# Altium PCB S56_MLD_tiny.pcbdoc (part 2 of 3)
Units mm, origin at the board's own origin, x right, y up, seen from the top; angles counter-clockwise.
Board outline 37.7 x 36.5 mm, 4 copper layers (Top Layer, Layer 1, Layer 3, Bottom Layer), stack 1.748 mm thick; 192 components, 89 nets, 791 pads, 423 vias.
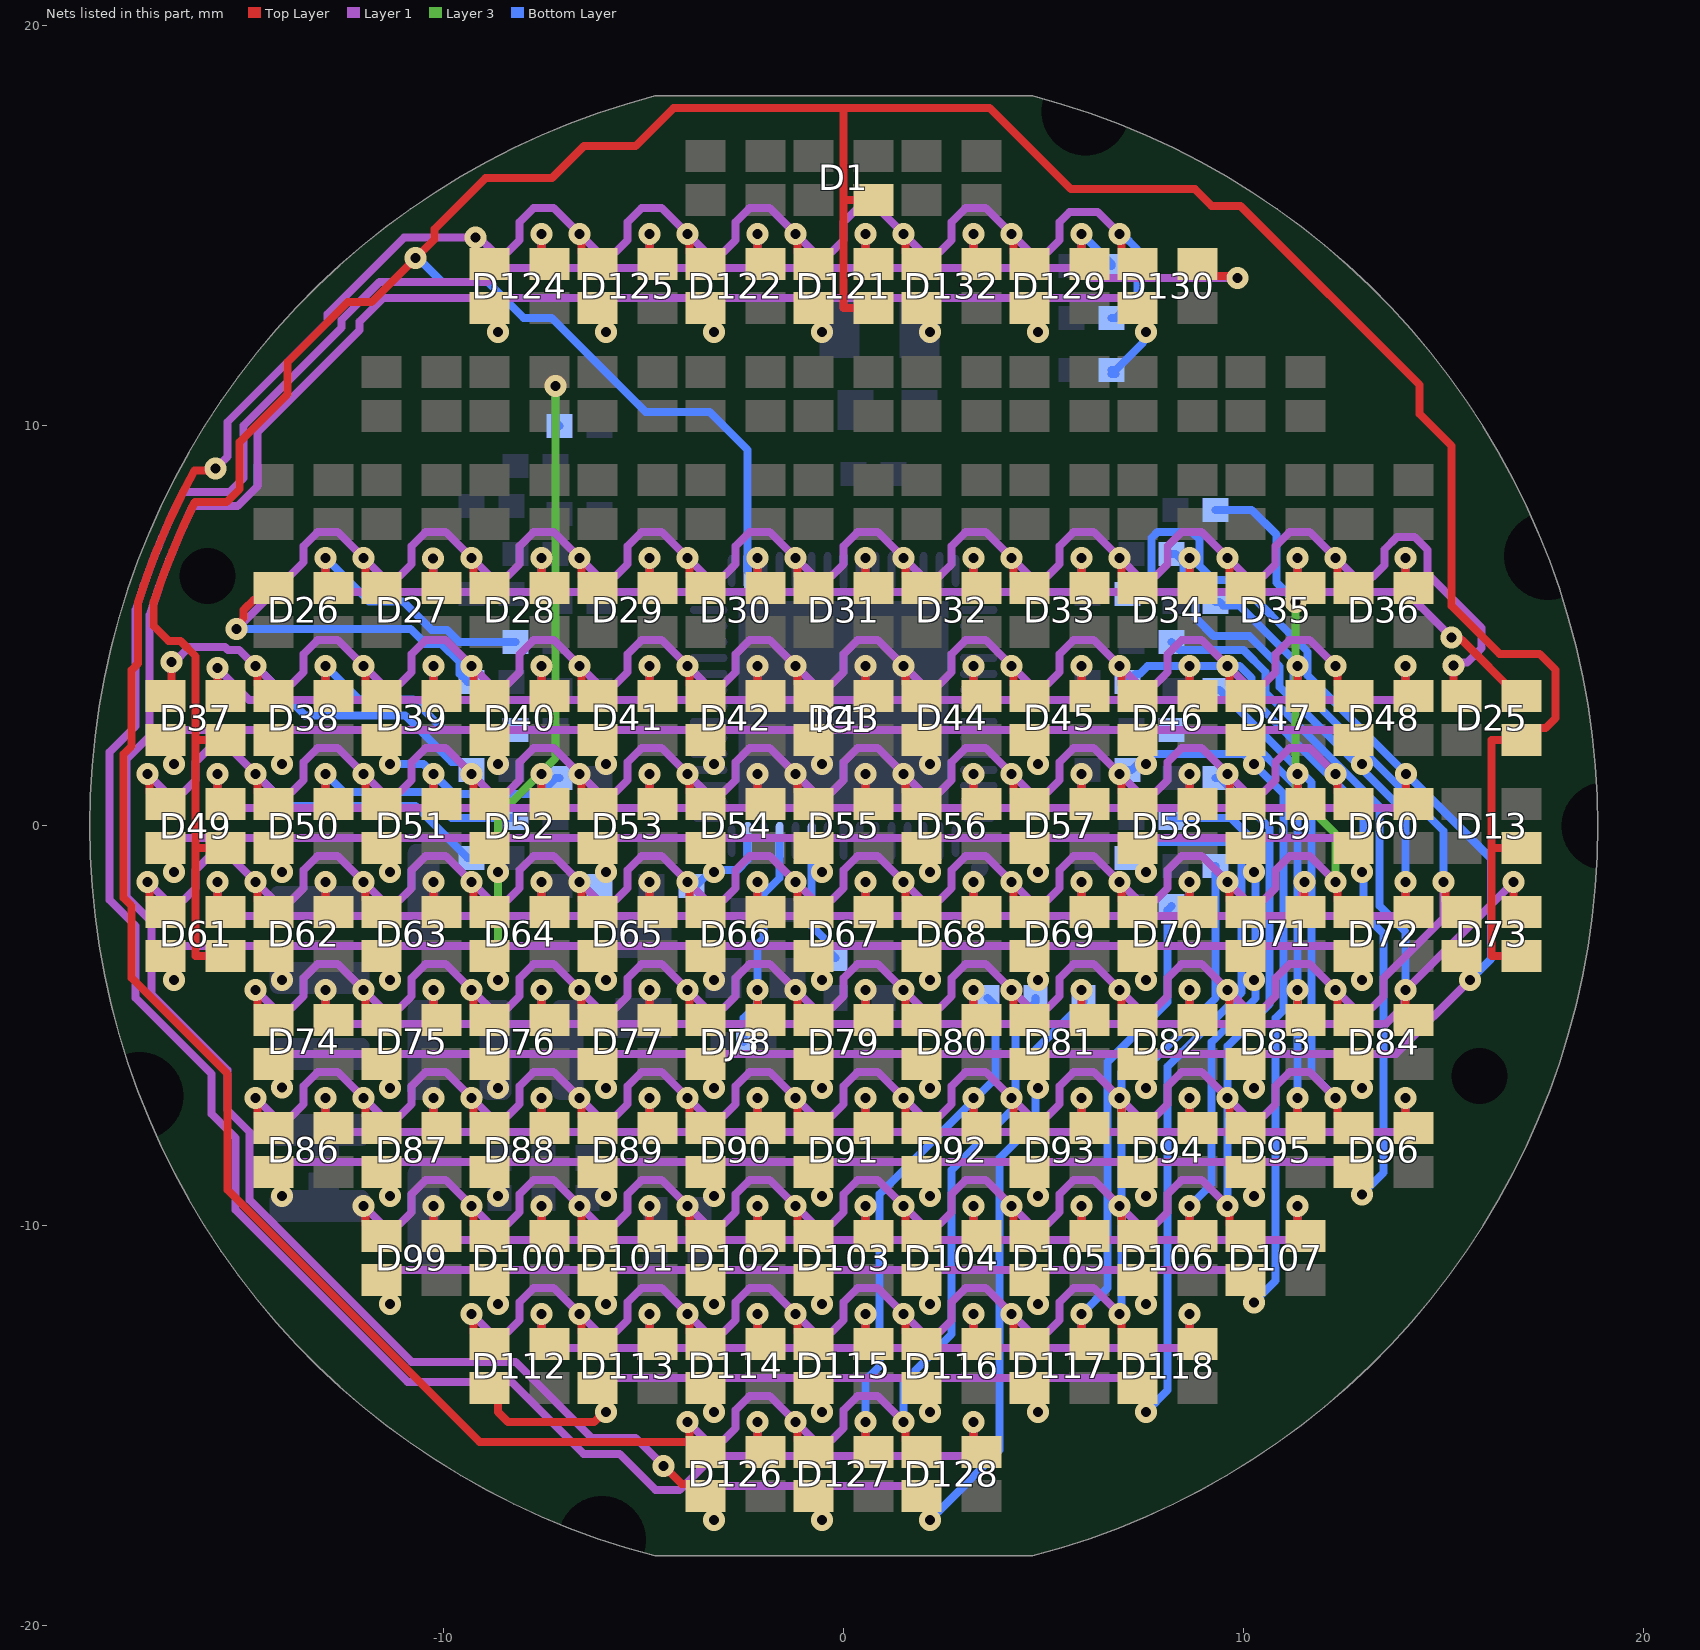
[diagram p4: the nets of this part, all layers, seen from the top]

## Via types
v1: diameter 0.55, hole 0.25, Top Layer to Layer 1, tented both sides, 200 vias
v2: diameter 0.55, hole 0.25, Top Layer to Bottom Layer, tented both sides, 178 vias
v3: diameter 0.55, hole 0.25, Layer 3 to Bottom Layer, tented both sides, 44 vias
v4: diameter 0.55/0.55/0.55/0.55 (per signal layer), hole 0.25, Top Layer to Bottom Layer, tented both sides, 1 vias

## Nets (pads, with @x,y where several pads share a name; then routed paths per layer and width w, separated by ;. In a path a pad name is that pad's centre, name@x,y a point inside that pad or via, vN(x,y) a via of type N, cw(c..) or ccw(c..) an arc to the next point about the centre after c; other vN are vias at no path point) (continued)
NetD25_3: D25.3 D26.3 D27.3 D28.3 D29.3 D30.3 D31.3 D32.3 D33.3 D34.3 D35.3 D36.3 R13.1 | length 65.7
  Top Layer w0.2: v2(-15.175,4.925) -15.175,5.02 -15,5.195 -15,5.395 -14.977,5.418 -14.977,5.423 -14.75,5.65 -14.55,5.65 D26.3@-14.25,5.95 ; v2(-12,6.7) -11.95,6.65 -11.95,6.25 -11.65,5.95 D27.3@-11.55,5.95 ; v1(-9.3,6.7) -9.25,6.65 -9.25,6.25 -8.95,5.95 D28.3@-8.85,5.95 ; v1(-6.6,6.7) -6.55,6.65 -6.55,6.25 -6.25,5.95 D29.3@-6.15,5.95 ; v1(-3.9,6.7) -3.85,6.65 -3.85,6.25 -3.55,5.95 D30.3@-3.45,5.95 ; v1(-1.2,6.7) -1.15,6.65 -1.15,6.25 -0.85,5.95 D31.3@-0.75,5.95 ; v1(1.5,6.7) 1.55,6.65 1.55,6.25 1.85,5.95 D32.3@1.95,5.95 ; v2(4.2,6.7) 4.25,6.65 4.25,6.25 4.55,5.95 D33.3@4.65,5.95 ; v1(6.9,6.7) 6.95,6.65 6.95,6.25 7.25,5.95 D34.3@7.35,5.95 ; v2(9.6,6.7) 9.65,6.65 9.65,6.25 9.95,5.95 D35.3@10.05,5.95 ; v2(12.3,6.7) 12.35,6.65 12.35,6.25 12.65,5.95 D36.3@12.75,5.95 ; v2(15.25,4.015) 15.25,3.35 15.35,3.25 D25.3@15.45,3.25
  Layer 1 w0.2: v2(-15.175,4.925) -13.5,6.6 -13.5,7 -13.15,7.35 -12.65,7.35 v2(-12,6.7) -11.55,6.25 -11.1,6.25 -10.8,6.55 -10.8,7 -10.45,7.35 -9.95,7.35 -8.85,6.25 -8.4,6.25 -8.1,6.55 -8.1,7 -7.75,7.35 -7.25,7.35 -6.15,6.25 -5.7,6.25 -5.4,6.55 -5.4,7 -5.05,7.35 -4.55,7.35 -3.45,6.25 -3,6.25 -2.7,6.55 -2.7,7 -2.35,7.35 -1.85,7.35 -0.75,6.25 -0.3,6.25 0,6.55 0,7 0.35,7.35 0.85,7.35 1.95,6.25 2.4,6.25 2.7,6.55 2.7,7 3.05,7.35 3.55,7.35 4.65,6.25 5.1,6.25 5.4,6.55 5.4,7 5.75,7.35 6.25,7.35 v1(6.9,6.7) 7.35,6.25 7.8,6.25 8.1,6.55 8.1,7 8.45,7.35 8.95,7.35 10.05,6.25 10.5,6.25 10.8,6.55 10.8,7 11.15,7.35 11.65,7.35 v2(12.3,6.7) ; v2@12.325,6.675 12.775,6.225 13.225,6.225 13.525,6.525 13.525,6.917 13.833,7.225 14.275,7.225 14.6,6.9 14.6,6.3 15.949,4.951 15.949,4.449 15.582,4.082 15.317,4.082 v2(15.25,4.015)
  Bottom Layer w0.2: v2(-15.175,4.925) -10.825,4.925 -10.45,4.55 -10.058,4.55 -9.6,4.092 -9.6,3.8 -9.4,3.6 R13.1@-9.3,3.6
NetD25_4: D25.4 D26.4 D27.4 D28.4 D29.4 D30.4 D31.4 D32.4 D33.4 D34.4 D35.4 D36.4 R14.1 | length 55.1
  Top Layer w0.2: v2(-12.95,6.7) -12.95,6.15 D26.4@-12.75,5.95 ; v2(-10.265,6.681) -10.265,6.165 D27.4@-10.05,5.95 ; v1(-7.55,6.7) -7.55,6.15 D28.4@-7.35,5.95 ; v1(-4.85,6.7) -4.85,6.15 D29.4@-4.65,5.95 ; v1(-2.15,6.7) -2.15,6.15 D30.4@-1.95,5.95 ; v1(0.55,6.7) 0.55,6.15 D31.4@0.75,5.95 ; v1(3.25,6.7) 3.25,6.15 D32.4@3.45,5.95 ; v1(5.95,6.7) 5.95,6.15 D33.4@6.15,5.95 ; v1(8.65,6.7) 8.65,6.15 D34.4@8.85,5.95 ; v2(11.35,6.7) 11.35,6.15 D35.4@11.55,5.95 ; v2(14.05,6.7) 14.05,6.15 D36.4@14.25,5.95 ; v2(15.2,4.713) 15.267,4.646 15.454,4.646 16.85,3.25 D25.4@16.95,3.25
  Layer 1 w0.2: v2(-12.95,6.7) -12.95,5.851 -10.25,5.851 ; v2(-10.265,6.681) -10.25,6.666 -10.25,5.851 ; v1(-7.55,6.7) -7.55,5.851 ; v1(-4.85,6.7) -4.85,5.851 ; v1(-2.15,6.7) -2.15,5.851 ; v1(0.55,6.7) 0.55,5.851 ; v1(3.25,6.7) 3.25,5.851 ; v1(5.95,6.7) 5.95,5.851 ; v1(8.65,6.7) 8.65,6.4 8.65,5.851 ; v2(11.35,6.7) 11.35,5.851 ; v2(14.05,6.7) 14.05,5.851 ; v2(15.2,4.713) 14.422,5.491 14.41,5.491 14.05,5.851 ; -10.25,5.851 -7.55,5.851 ; -7.55,5.851 -4.85,5.851 ; -4.85,5.851 -2.15,5.851 ; -2.15,5.851 0.55,5.851 ; 0.55,5.851 3.25,5.851 ; 3.25,5.851 5.95,5.851 ; 5.95,5.851 8.65,5.851 ; 8.65,5.851 11.35,5.851 ; 11.35,5.851 14.05,5.851
  Bottom Layer w0.2: v2(-12.95,6.7) -11.867,5.617 -11.017,5.617 -10.3,4.9 -9.913,4.9 -9.613,4.6 R14.1@-8.2,4.6
NetD37_2: D37.2 D38.2 D39.2 D40.2 D41.2 D42.2 D43.2 D44.2 D45.2 D46.2 D47.2 D48.2 R15.1 | length 52.8
  Top Layer w0.2: D37.2@-16.95,2.15 -16.747,1.947 v2(-16.747,1.551) ; D38.2@-14.25,2.15 -14.047,1.947 v2(-14.047,1.551) ; D39.2@-11.55,2.15 -11.347,1.947 v2(-11.347,1.551) ; D40.2@-8.85,2.15 -8.647,1.947 v1(-8.647,1.551) ; D41.2@-6.15,2.15 -5.947,1.947 v1(-5.947,1.551) ; D42.2@-3.45,2.15 -3.247,1.947 v1(-3.247,1.551) ; D43.2@-0.75,2.15 -0.547,1.947 v1(-0.547,1.551) ; D44.2@1.95,2.15 2.153,1.947 v1(2.153,1.551) ; D45.2@4.65,2.15 4.853,1.947 v1(4.853,1.551) ; D46.2@7.35,2.15 7.553,1.947 v1(7.553,1.551) ; D47.2@10.05,2.15 10.253,1.947 v1(10.253,1.551) ; D48.2@12.75,2.15 12.953,1.947 v1(12.953,1.551)
  Layer 1 w0.2: v2@-16.747,1.559 -16.747,2.4 -14.047,2.4 ; v2(-14.047,1.551) -14.047,2.4 ; v2(-11.347,1.551) -11.347,2.4 ; v1(-8.647,1.551) -8.647,2.4 ; v1(-5.947,1.551) -5.947,2.4 ; v1(-3.247,1.551) -3.247,2.4 ; v1(-0.547,1.551) -0.547,2.4 ; v1(2.153,1.551) 2.153,2.4 ; v1(4.853,1.551) 4.853,2.4 ; v1(7.553,1.551) 7.553,2.4 ; v1(10.253,1.551) 10.253,2.4 ; v1(12.953,1.551) 12.953,2.4 10.253,2.4 ; -14.047,2.4 -11.347,2.4 ; -11.347,2.4 -8.647,2.4 ; -8.647,2.4 -5.947,2.4 ; -5.947,2.4 -3.247,2.4 ; -3.247,2.4 -0.547,2.4 ; -0.547,2.4 2.153,2.4 ; 2.153,2.4 4.853,2.4 ; 4.853,2.4 7.553,2.4 ; 7.553,2.4 10.253,2.4
  Bottom Layer w0.2: v2(-11.347,1.551) -10.505,1.551 -9.754,0.8 -7.517,0.8 -7.4,0.917 -7.4,1 -7.2,1.2 R15.1@-7.1,1.2
NetD37_3: D37.3 D38.3 D39.3 D40.3 D41.3 D42.3 D43.3 D44.3 D45.3 D46.3 D47.3 D48.3 R16.1 | length 59.5
  Top Layer w0.2: D37.3@-16.95,3.25 -16.8,3.4 v2(-16.8,4.1) ; v2(-14.7,4) -14.65,3.95 -14.65,3.55 -14.35,3.25 D38.3@-14.25,3.25 ; v2(-12,4) -11.95,3.95 -11.95,3.55 -11.65,3.25 D39.3@-11.55,3.25 ; v1(-9.3,4) -9.25,3.95 -9.25,3.55 -8.95,3.25 D40.3@-8.85,3.25 ; v1(-6.6,4) -6.55,3.95 -6.55,3.55 -6.25,3.25 D41.3@-6.15,3.25 ; v1(-3.9,4) -3.85,3.95 -3.85,3.55 -3.55,3.25 D42.3@-3.45,3.25 ; v1(-1.2,4) -1.15,3.95 -1.15,3.55 -0.85,3.25 D43.3@-0.75,3.25 ; v1(1.5,4) 1.55,3.95 1.55,3.55 1.85,3.25 D44.3@1.95,3.25 ; v1(4.2,4) 4.25,3.95 4.25,3.55 4.55,3.25 D45.3@4.65,3.25 ; v1(6.9,4) 6.95,3.95 6.95,3.55 7.25,3.25 D46.3@7.35,3.25 ; v1(9.6,4) 9.65,3.95 9.65,3.55 9.95,3.25 D47.3@10.05,3.25 ; v2(12.3,4) 12.35,3.95 12.35,3.55 12.65,3.25 D48.3@12.75,3.25
  Layer 1 w0.2: v2(-16.8,4.1) -16.733,4.1 -16.36,4.473 -15.465,4.473 -15.392,4.4 -15.113,4.4 -14.713,4 v2(-14.7,4) -14.25,3.55 -13.8,3.55 -13.5,3.85 -13.5,4.3 -13.15,4.65 -12.65,4.65 -11.55,3.55 -11.1,3.55 -10.8,3.85 -10.8,4.3 -10.45,4.65 -9.95,4.65 -8.85,3.55 -8.4,3.55 -8.1,3.85 -8.1,4.3 -7.75,4.65 -7.25,4.65 -6.15,3.55 -5.7,3.55 -5.4,3.85 -5.4,4.3 -5.05,4.65 -4.55,4.65 -3.45,3.55 -3,3.55 -2.7,3.85 -2.7,4.3 -2.35,4.65 -1.85,4.65 -0.75,3.55 -0.3,3.55 0,3.85 0,4.3 0.35,4.65 0.85,4.65 1.95,3.55 2.4,3.55 2.7,3.85 2.7,4.3 3.05,4.65 3.55,4.65 4.65,3.55 5.1,3.55 5.4,3.85 5.4,4.3 5.75,4.65 6.25,4.65 v1(6.9,4) 7.35,3.55 7.8,3.55 8.1,3.85 8.1,4.3 8.45,4.65 8.95,4.65 10.05,3.55 10.5,3.55 10.8,3.85 10.8,4.3 11.15,4.65 11.65,4.65 v2(12.3,4)
  Bottom Layer w0.2: v2(-14.7,4) -13.467,2.767 -10.967,2.767 -9.8,1.6 -9.6,1.6 -9.4,1.4 R16.1@-9.3,1.4
NetD37_4: D37.4 D38.4 D39.4 D40.4 D41.4 D42.4 D43.4 D44.4 D45.4 D46.4 D47.4 D48.4 R17.1 | length 54.7
  Top Layer w0.2: v2(-15.66,3.948) -15.66,3.46 D37.4@-15.45,3.25 ; v2(-12.95,4) -12.95,3.45 D38.4@-12.75,3.25 ; v2(-10.25,4) -10.25,3.45 D39.4@-10.05,3.25 ; v1(-7.55,4) -7.55,3.45 D40.4@-7.35,3.25 ; v1(-4.85,4) -4.85,3.45 D41.4@-4.65,3.25 ; v1(-2.15,4) -2.15,3.45 D42.4@-1.95,3.25 ; v1(0.55,4) 0.55,3.45 D43.4@0.75,3.25 ; v1(3.25,4) 3.25,3.45 D44.4@3.45,3.25 ; v1(5.95,4) 5.95,3.45 D45.4@6.15,3.25 ; v1(8.65,4) 8.65,3.45 D46.4@8.85,3.25 ; v1(11.35,4) 11.35,3.45 D47.4@11.55,3.25 ; v2(14.05,4) 14.05,3.45 D48.4@14.25,3.25
  Layer 1 w0.2: v2(-15.66,3.948) -14.863,3.151 -12.95,3.151 ; v2(-12.95,4) -12.95,3.151 ; v2(-10.25,4) -10.25,3.151 ; v1(-7.55,4) -7.55,3.151 ; v1(-4.85,4) -4.85,3.151 ; v1(-2.15,4) -2.15,3.151 ; v1(0.55,4) 0.55,3.151 ; v1(3.25,4) 3.25,3.151 ; v1(5.95,4) 5.95,3.151 ; v1(8.65,4) 8.65,3.151 ; v1(11.35,4) 11.35,3.151 ; v2(14.05,4) 14.05,3.151 11.35,3.151 ; -12.95,3.151 -10.25,3.151 ; -10.25,3.151 -7.55,3.151 ; -7.55,3.151 -4.85,3.151 ; -4.85,3.151 -2.15,3.151 ; -2.15,3.151 0.55,3.151 ; 0.55,3.151 3.25,3.151 ; 3.25,3.151 5.95,3.151 ; 5.95,3.151 8.65,3.151 ; 8.65,3.151 11.35,3.151
  Bottom Layer w0.2: v2(-12.95,4) -12.117,3.167 -10.767,3.167 -10,2.4 R17.1@-8.2,2.4
NetD49_2: D49.2 D50.2 D51.2 D52.2 D53.2 D54.2 D55.2 D56.2 D57.2 D58.2 D59.2 D60.2 R18.1 | length 48.1
  Top Layer w0.2: D49.2@-16.95,-0.55 -16.747,-0.753 v2(-16.747,-1.149) ; D50.2@-14.25,-0.55 -14.047,-0.753 v1(-14.047,-1.149) ; D51.2@-11.55,-0.55 -11.347,-0.753 v1(-11.347,-1.149) ; D52.2@-8.85,-0.55 -8.647,-0.753 v1(-8.647,-1.149) ; D53.2@-6.15,-0.55 -5.947,-0.753 v2(-5.947,-1.149) ; D54.2@-3.45,-0.55 -3.247,-0.753 v1(-3.247,-1.149) ; D55.2@-0.75,-0.55 -0.547,-0.753 v1(-0.547,-1.149) ; D56.2@1.95,-0.55 2.153,-0.753 v1(2.153,-1.149) ; D57.2@4.65,-0.55 4.853,-0.753 v1(4.853,-1.149) ; D58.2@7.35,-0.55 7.553,-0.753 v1(7.553,-1.149) ; D59.2@10.05,-0.55 10.253,-0.753 v1(10.253,-1.149) ; D60.2@12.75,-0.55 12.953,-0.753 v1(12.953,-1.149)
  Layer 1 w0.2: v2@-16.747,-1.141 -16.747,-0.3 -14.047,-0.3 ; v1(-14.047,-1.149) -14.047,-0.3 ; v1(-11.347,-1.149) -11.347,-0.3 ; v1(-8.647,-1.149) -8.647,-0.3 ; v2(-5.947,-1.149) -5.947,-0.3 ; v1(-3.247,-1.149) -3.247,-0.3 ; v1(-0.547,-1.149) -0.547,-0.3 ; v1(2.153,-1.149) 2.153,-0.3 ; v1(4.853,-1.149) 4.853,-0.3 ; v1(7.553,-1.149) 7.553,-0.3 ; v1(10.253,-1.149) 10.253,-0.3 ; v1(12.953,-1.149) 12.953,-0.3 10.253,-0.3 ; -14.047,-0.3 -11.347,-0.3 ; -11.347,-0.3 -8.647,-0.3 ; -8.647,-0.3 -5.947,-0.3 ; -5.947,-0.3 -3.247,-0.3 ; -3.247,-0.3 -0.547,-0.3 ; -0.547,-0.3 2.153,-0.3 ; 2.153,-0.3 4.853,-0.3 ; 4.853,-0.3 7.553,-0.3 ; 7.553,-0.3 10.253,-0.3
NetD49_3: D49.3 D50.3 D51.3 D52.3 D53.3 D54.3 D55.3 D56.3 D57.3 D58.3 D59.3 D60.3 R19.1 | length 60.8
  Top Layer w0.2: v2(-17.4,1.3) -17.35,1.25 -17.35,0.85 -17.05,0.55 D49.3@-16.95,0.55 ; v2(-14.7,1.3) -14.65,1.25 -14.65,0.85 -14.35,0.55 D50.3@-14.25,0.55 ; v1(-12,1.3) -11.95,1.25 -11.95,0.85 -11.65,0.55 D51.3@-11.55,0.55 ; v1(-9.3,1.3) -9.25,1.25 -9.25,0.85 -8.95,0.55 D52.3@-8.85,0.55 ; v1(-6.6,1.3) -6.55,1.25 -6.55,0.85 -6.25,0.55 D53.3@-6.15,0.55 ; v1(-3.9,1.3) -3.85,1.25 -3.85,0.85 -3.55,0.55 D54.3@-3.45,0.55 ; v1(-1.2,1.3) -1.15,1.25 -1.15,0.85 -0.85,0.55 D55.3@-0.75,0.55 ; v1(1.5,1.3) 1.55,1.25 1.55,0.85 1.85,0.55 D56.3@1.95,0.55 ; v1(4.2,1.3) 4.25,1.25 4.25,0.85 4.55,0.55 D57.3@4.65,0.55 ; v1(6.9,1.3) 6.95,1.25 6.95,0.85 7.25,0.55 D58.3@7.35,0.55 ; v1(9.6,1.3) 9.65,1.25 9.65,0.85 9.95,0.55 D59.3@10.05,0.55 ; v1(12.3,1.3) 12.35,1.25 12.35,0.85 12.65,0.55 D60.3@12.75,0.55
  Layer 1 w0.2: v2(-17.4,1.3) -16.95,0.85 -16.5,0.85 -16.2,1.15 -16.2,1.6 -15.85,1.95 -15.35,1.95 v2(-14.7,1.3) -14.25,0.85 -13.8,0.85 -13.5,1.15 -13.5,1.6 -13.15,1.95 -12.65,1.95 -11.55,0.85 -11.1,0.85 -10.8,1.15 -10.8,1.6 -10.45,1.95 -9.95,1.95 -8.85,0.85 -8.4,0.85 -8.1,1.15 -8.1,1.6 -7.75,1.95 -7.25,1.95 -6.15,0.85 -5.7,0.85 -5.4,1.15 -5.4,1.6 -5.05,1.95 -4.55,1.95 -3.45,0.85 -3,0.85 -2.7,1.15 -2.7,1.6 -2.35,1.95 -1.85,1.95 -0.75,0.85 -0.3,0.85 0,1.15 0,1.6 0.35,1.95 0.85,1.95 1.95,0.85 2.4,0.85 2.7,1.15 2.7,1.6 3.05,1.95 3.55,1.95 v1(4.2,1.3) 4.65,0.85 5.1,0.85 5.4,1.15 5.4,1.6 5.75,1.95 6.25,1.95 7.35,0.85 7.8,0.85 8.1,1.15 8.1,1.6 8.45,1.95 8.95,1.95 v1(9.6,1.3) 10.05,0.85 10.5,0.85 10.8,1.15 10.8,1.6 11.15,1.95 11.65,1.95 v1(12.3,1.3)
  Bottom Layer w0.2: v2(-14.7,1.3) -13.9,0.5 -10.7,0.5 -9.4,-0.8 R19.1@-9.3,-0.8
NetD49_4: D49.4 D50.4 D51.4 D52.4 D53.4 D54.4 D55.4 D56.4 D57.4 D58.4 D59.4 D60.4 R20.1 | length 55.1
  Top Layer w0.2: v2(-15.65,1.3) -15.65,0.75 D49.4@-15.45,0.55 ; v2(-12.95,1.3) -12.95,0.75 D50.4@-12.75,0.55 ; v1(-10.25,1.3) -10.25,0.75 D51.4@-10.05,0.55 ; v1(-7.55,1.3) -7.55,0.75 D52.4@-7.35,0.55 ; v1(-4.85,1.3) -4.85,0.75 D53.4@-4.65,0.55 ; v1(-2.15,1.3) -2.15,0.75 D54.4@-1.95,0.55 ; v1(0.55,1.3) 0.55,0.75 D55.4@0.75,0.55 ; v1(3.25,1.3) 3.25,0.75 D56.4@3.45,0.55 ; v1(5.95,1.3) 5.95,0.75 D57.4@6.15,0.55 ; v1(8.65,1.3) 8.65,0.75 D58.4@8.85,0.55 ; v1(11.35,1.3) 11.35,0.75 D59.4@11.55,0.55 ; v1(14.062,1.298) 14.062,0.738 D60.4@14.25,0.55
  Layer 1 w0.2: v2(-15.65,1.3) -15.65,0.451 -12.95,0.451 ; v2(-12.95,1.3) -12.95,0.451 ; v1(-10.25,1.3) -10.25,0.451 ; v1(-7.55,1.3) -7.55,0.451 ; v1(-4.85,1.3) -4.85,0.451 ; v1(-2.15,1.3) -2.15,0.451 ; v1(0.55,1.3) 0.55,0.451 ; v1(3.25,1.3) 3.25,0.451 ; v1(5.95,1.3) 5.95,0.451 ; v1(8.65,1.3) 8.65,0.451 ; v1(11.35,1.3) 11.35,0.451 ; v1(14.062,1.298) 14.05,1.286 14.05,0.451 11.35,0.451 ; -12.95,0.451 -10.25,0.451 ; -10.25,0.451 -7.55,0.451 ; -7.55,0.451 -4.85,0.451 ; -4.85,0.451 -2.15,0.451 ; -2.15,0.451 0.55,0.451 ; 0.55,0.451 3.25,0.451 ; 3.25,0.451 5.95,0.451 ; 5.95,0.451 8.65,0.451 ; 8.65,0.451 11.35,0.451
  Bottom Layer w0.2: v2(-12.95,1.3) -12.5,0.85 -10.45,0.85 -9.8,0.2 R20.1@-8.2,0.2
NetD61_2: D61.2 D62.2 D63.2 D64.2 D65.2 D66.2 D67.2 D68.2 D69.2 D70.2 D71.2 D72.2 R21.1 | length 64.6
  Top Layer w0.2: D61.2@-16.95,-3.25 -16.747,-3.453 v1(-16.747,-3.849) ; D62.2@-14.25,-3.25 -14.047,-3.453 v1(-14.047,-3.849) ; D63.2@-11.55,-3.25 -11.347,-3.453 v1(-11.347,-3.849) ; D64.2@-8.85,-3.25 -8.647,-3.453 v2(-8.647,-3.849) ; D65.2@-6.15,-3.25 -5.947,-3.453 v1(-5.947,-3.849) ; D66.2@-3.45,-3.25 -3.247,-3.453 v1(-3.247,-3.849) ; D67.2@-0.75,-3.25 -0.547,-3.453 v1(-0.547,-3.849) ; D68.2@1.95,-3.25 2.153,-3.453 v1(2.153,-3.849) ; D69.2@4.65,-3.25 4.853,-3.453 v1(4.853,-3.849) ; D70.2@7.35,-3.25 7.553,-3.453 v2(7.553,-3.849) ; D71.2@10.05,-3.25 10.253,-3.453 v1(10.253,-3.849) ; D72.2@12.75,-3.25 12.953,-3.453 v2(12.953,-3.849)
  Layer 1 w0.2: v1@-16.747,-3.841 -16.747,-3 -14.047,-3 ; v1@-14.047,-3.841 -14.047,-3 ; v1(-11.347,-3.849) -11.347,-3 ; v2(-8.647,-3.849) -8.647,-3 ; v1(-5.947,-3.849) -5.947,-3 ; v1(-3.247,-3.849) -3.247,-3 ; v1(-0.547,-3.849) -0.547,-3 ; v1(2.153,-3.849) 2.153,-3 ; v1(4.853,-3.849) 4.853,-3 ; v2(7.553,-3.849) 7.553,-3 ; v1(10.253,-3.849) 10.253,-3 ; v2(12.953,-3.849) 12.953,-3 10.253,-3 ; -14.047,-3 -11.347,-3 ; -11.347,-3 -8.647,-3 ; -8.647,-3 -5.947,-3 ; -5.947,-3 -3.247,-3 ; -3.247,-3 -0.547,-3 ; -0.547,-3 2.153,-3 ; 2.153,-3 4.853,-3 ; 4.853,-3 7.553,-3 ; 7.553,-3 10.253,-3
  Layer 3 w0.2: v2(-8.647,-3.849) -8.647,0.253 -7.2,1.7 v3(-7.2,11)
  Bottom Layer w0.2: v3(-7.2,11) -7.2,10.1 R21.1@-7.1,10
NetD61_3: D61.3 D62.3 D63.3 D64.3 D65.3 D66.3 D67.3 D68.3 D69.3 D70.3 D71.3 D72.3 R22.1 | length 65.6
  Top Layer w0.2: v2(-17.4,-1.4) -17.35,-1.45 -17.35,-1.85 -17.05,-2.15 D61.3@-16.95,-2.15 ; v2(-14.7,-1.4) -14.65,-1.45 -14.65,-1.85 -14.35,-2.15 D62.3@-14.25,-2.15 ; v1(-12,-1.4) -11.95,-1.45 -11.95,-1.85 -11.65,-2.15 D63.3@-11.55,-2.15 ; v1(-9.3,-1.4) -9.25,-1.45 -9.25,-1.85 -8.95,-2.15 D64.3@-8.85,-2.15 ; v1(-6.6,-1.4) -6.55,-1.45 -6.55,-1.85 -6.25,-2.15 D65.3@-6.15,-2.15 ; v1(-3.9,-1.4) -3.85,-1.45 -3.85,-1.85 -3.55,-2.15 D66.3@-3.45,-2.15 ; v1(-1.2,-1.4) -1.15,-1.45 -1.15,-1.85 -0.85,-2.15 D67.3@-0.75,-2.15 ; v1(1.5,-1.4) 1.55,-1.45 1.55,-1.85 1.85,-2.15 D68.3@1.95,-2.15 ; v1(4.2,-1.4) 4.25,-1.45 4.25,-1.85 4.55,-2.15 D69.3@4.65,-2.15 ; v1(6.9,-1.4) 6.95,-1.45 6.95,-1.85 7.25,-2.15 D70.3@7.35,-2.15 ; v1(9.6,-1.4) 9.65,-1.45 9.65,-1.85 9.95,-2.15 D71.3@10.05,-2.15 ; v2(12.3,-1.4) 12.35,-1.45 12.35,-1.85 12.65,-2.15 D72.3@12.75,-2.15
  Layer 1 w0.2: v2(-17.4,-1.4) -16.95,-1.85 -16.5,-1.85 -16.2,-1.55 -16.2,-1.1 -15.85,-0.75 -15.35,-0.75 v2(-14.7,-1.4) -14.25,-1.85 -13.8,-1.85 -13.5,-1.55 -13.5,-1.1 -13.15,-0.75 -12.65,-0.75 -11.55,-1.85 -11.1,-1.85 -10.8,-1.55 -10.8,-1.1 -10.45,-0.75 -9.95,-0.75 -8.85,-1.85 -8.4,-1.85 -8.1,-1.55 -8.1,-1.1 -7.75,-0.75 -7.25,-0.75 -6.15,-1.85 -5.7,-1.85 -5.4,-1.55 -5.4,-1.1 -5.05,-0.75 -4.55,-0.75 -3.45,-1.85 -3,-1.85 -2.7,-1.55 -2.7,-1.1 -2.35,-0.75 -1.85,-0.75 -0.75,-1.85 -0.3,-1.85 0,-1.55 0,-1.1 0.35,-0.75 0.85,-0.75 1.95,-1.85 2.4,-1.85 2.7,-1.55 2.7,-1.1 3.05,-0.75 3.55,-0.75 v1(4.2,-1.4) 4.65,-1.85 5.1,-1.85 5.4,-1.55 5.4,-1.1 5.75,-0.75 6.25,-0.75 7.35,-1.85 7.8,-1.85 8.1,-1.55 8.1,-1.1 8.45,-0.75 8.95,-0.75 v1(9.6,-1.4) 10.05,-1.85 10.5,-1.85 10.8,-1.55 10.8,-1.1 11.15,-0.75 11.65,-0.75 v2(12.3,-1.4)
  Layer 3 w0.2: v3(11.3,5.6) 11.3,0.8 12.3,-0.2 v2(12.3,-1.4)
  Bottom Layer w0.2: R22.1@9.3,7.9 10.2,7.9 10.817,7.283 10.817,6.083 v3(11.3,5.6)
NetD61_4: D61.4 D62.4 D63.4 D64.4 D65.4 D66.4 D67.4 D68.4 D69.4 D70.4 D71.4 D72.4 R23.1 | length 61.1
  Top Layer w0.2: v1(-15.65,-1.4) -15.65,-1.95 D61.4@-15.45,-2.15 ; v1(-12.95,-1.4) -12.95,-1.95 D62.4@-12.75,-2.15 ; v1(-10.25,-1.4) -10.25,-1.95 D63.4@-10.05,-2.15 ; v1(-7.55,-1.4) -7.55,-1.95 D64.4@-7.35,-2.15 ; v1(-4.85,-1.4) -4.85,-1.95 D65.4@-4.65,-2.15 ; v1(-2.15,-1.4) -2.15,-1.95 D66.4@-1.95,-2.15 ; v1(0.55,-1.4) 0.55,-1.95 D67.4@0.75,-2.15 ; v1(3.25,-1.4) 3.25,-1.95 D68.4@3.45,-2.15 ; v1(5.95,-1.4) 5.95,-1.95 D69.4@6.15,-2.15 ; v1(8.65,-1.4) 8.65,-1.95 D70.4@8.85,-2.15 ; v1(11.525,-1.4) 11.525,-2.125 D71.4@11.55,-2.15 ; v2(14.05,-1.4) 14.05,-1.95 D72.4@14.25,-2.15
  Layer 1 w0.2: v1(-15.65,-1.4) -15.65,-2.249 -12.95,-2.249 ; v1(-12.95,-1.4) -12.95,-2.249 ; v1(-10.25,-1.4) -10.25,-2.249 ; v1(-7.55,-1.4) -7.55,-2.249 ; v1(-4.85,-1.4) -4.85,-2.249 ; v1(-2.15,-1.4) -2.15,-2.249 ; v1(0.55,-1.4) 0.55,-2.249 ; v1(3.25,-1.4) 3.25,-2.249 ; v1(5.95,-1.4) 5.95,-2.249 ; v1(8.65,-1.4) 8.65,-2.249 ; v1(11.525,-1.4) 11.458,-1.467 11.458,-1.858 11.35,-1.966 11.35,-2.249 ; v2(14.05,-1.4) 14.05,-2.249 11.35,-2.249 ; -12.95,-2.249 -10.25,-2.249 ; -10.25,-2.249 -7.55,-2.249 ; -7.55,-2.249 -4.85,-2.249 ; -4.85,-2.249 -2.15,-2.249 ; -2.15,-2.249 0.55,-2.249 ; 0.55,-2.249 3.25,-2.249 ; 3.25,-2.249 5.95,-2.249 ; 5.95,-2.249 8.65,-2.249 ; 8.65,-2.249 11.35,-2.249
  Bottom Layer w0.2: R23.1@8.2,6.8 8.3,6.8 8.5,6.6 8.5,6.304 8.8,6.004 8.8,5.196 9.246,4.75 10.14,4.75 10.9,3.99 10.9,3.475 14.05,0.325 v2(14.05,-1.4)
NetD73_2: D73.2 D74.2 D75.2 D76.2 D77.2 D78.2 D79.2 D80.2 D81.2 D82.2 D83.2 D84.2 R24.1 | length 65.6
  Top Layer w0.2: D74.2@-14.25,-5.95 -14.047,-6.153 v2(-14.047,-6.541) ; D75.2@-11.55,-5.95 -11.347,-6.153 v1(-11.347,-6.549) ; D76.2@-8.85,-5.95 -8.647,-6.153 v1(-8.647,-6.549) ; D77.2@-6.15,-5.95 -5.947,-6.153 v1(-5.947,-6.549) ; D78.2@-3.45,-5.95 -3.247,-6.153 v1(-3.247,-6.549) ; D79.2@-0.75,-5.95 -0.547,-6.153 v1(-0.547,-6.549) ; D80.2@1.95,-5.95 2.153,-6.153 v1(2.153,-6.549) ; D81.2@4.65,-5.95 4.853,-6.153 v1(4.853,-6.549) ; D82.2@7.35,-5.95 7.553,-6.153 v2(7.553,-6.549) ; D83.2@10.05,-5.95 10.253,-6.153 v2(10.253,-6.549) ; D84.2@12.75,-5.95 12.953,-6.153 v2(12.953,-6.549) ; D73.2@15.45,-3.25 15.653,-3.453 v2(15.653,-3.849)
  Layer 1 w0.2: v2(-14.047,-6.541) -14.047,-5.7 -11.347,-5.7 ; v1(-11.347,-6.549) -11.347,-5.7 ; v1(-8.647,-6.549) -8.647,-5.7 ; v1(-5.947,-6.549) -5.947,-5.7 ; v1(-3.247,-6.549) -3.247,-5.7 ; v1(-0.547,-6.549) -0.547,-5.7 ; v1(2.153,-6.549) 2.153,-5.7 ; v1(4.853,-6.549) 4.853,-5.7 ; v2(7.553,-6.549) 7.553,-5.7 ; v2(10.253,-6.549) 10.253,-5.7 ; v2(12.953,-6.549) 12.953,-5.7 ; v2(15.653,-3.849) 13.802,-5.7 12.953,-5.7 ; -11.347,-5.7 -8.647,-5.7 ; -8.647,-5.7 -5.947,-5.7 ; -5.947,-5.7 -3.247,-5.7 ; -3.247,-5.7 -0.547,-5.7 ; -0.547,-5.7 2.153,-5.7 ; 2.153,-5.7 4.853,-5.7 ; 4.853,-5.7 7.553,-5.7 ; 7.553,-5.7 10.253,-5.7 ; 10.253,-5.7 12.953,-5.7
  Bottom Layer w0.2: R24.1@7.1,5.8 7.2,5.8 7.7,6.3 7.7,7.204 7.846,7.35 8.704,7.35 8.9,7.154 8.9,6.5 9.25,6.15 9.804,6.15 11.6,4.354 11.6,3.765 16.178,-0.814 16.178,-3.324 v2(15.653,-3.849)
NetD73_3: D73.3 D74.3 D75.3 D76.3 D77.3 D78.3 D79.3 D80.3 D81.3 D82.3 D83.3 D84.3 R25.1 | length 65.3
  Top Layer w0.2: v1(-14.7,-4.1) -14.65,-4.15 -14.65,-4.55 -14.35,-4.85 D74.3@-14.25,-4.85 ; v1(-12,-4.1) -11.95,-4.15 -11.95,-4.55 -11.65,-4.85 D75.3@-11.55,-4.85 ; v1(-9.3,-4.1) -9.25,-4.15 -9.25,-4.55 -8.95,-4.85 D76.3@-8.85,-4.85 ; v1(-6.6,-4.1) -6.55,-4.15 -6.55,-4.55 -6.25,-4.85 D77.3@-6.15,-4.85 ; v1(-3.9,-4.1) -3.85,-4.15 -3.85,-4.55 -3.55,-4.85 D78.3@-3.45,-4.85 ; v1(-1.2,-4.1) -1.15,-4.15 -1.15,-4.55 -0.85,-4.85 D79.3@-0.75,-4.85 ; v1(1.5,-4.1) 1.55,-4.15 1.55,-4.55 1.85,-4.85 D80.3@1.95,-4.85 ; v1(4.2,-4.1) 4.25,-4.15 4.25,-4.55 4.55,-4.85 D81.3@4.65,-4.85 ; v2(6.9,-4.1) 6.95,-4.15 6.95,-4.55 7.25,-4.85 D82.3@7.35,-4.85 ; v1(9.6,-4.1) 9.65,-4.15 9.65,-4.55 9.95,-4.85 D83.3@10.05,-4.85 ; v2(12.3,-4.1) 12.35,-4.15 12.35,-4.55 12.65,-4.85 D84.3@12.75,-4.85 ; v2(15,-1.4) 15.05,-1.45 15.05,-1.85 15.35,-2.15 D73.3@15.45,-2.15
  Layer 1 w0.2: v1(-14.7,-4.1) -14.25,-4.55 -13.8,-4.55 -13.5,-4.25 -13.5,-3.8 -13.15,-3.45 -12.65,-3.45 v1(-12,-4.1) -11.55,-4.55 -11.1,-4.55 -10.8,-4.25 -10.8,-3.8 -10.45,-3.45 -9.95,-3.45 -8.85,-4.55 -8.4,-4.55 -8.1,-4.25 -8.1,-3.8 -7.75,-3.45 -7.25,-3.45 -6.15,-4.55 -5.7,-4.55 -5.4,-4.25 -5.4,-3.8 -5.05,-3.45 -4.55,-3.45 -3.45,-4.55 -3,-4.55 -2.7,-4.25 -2.7,-3.8 -2.35,-3.45 -1.85,-3.45 -0.75,-4.55 -0.3,-4.55 0,-4.25 0,-3.8 0.35,-3.45 0.85,-3.45 1.95,-4.55 2.4,-4.55 2.7,-4.25 2.7,-3.8 3.05,-3.45 3.55,-3.45 4.65,-4.55 5.1,-4.55 5.4,-4.25 5.4,-3.8 5.75,-3.45 6.25,-3.45 v2(6.9,-4.1) 7.35,-4.55 7.8,-4.55 8.1,-4.25 8.1,-3.8 8.45,-3.45 8.95,-3.45 10.05,-4.55 10.5,-4.55 10.8,-4.25 10.8,-3.8 11.15,-3.45 11.65,-3.45 12.75,-4.55 13.2,-4.55 13.5,-4.25 13.5,-3.8 15,-2.3 v2(15,-1.4)
  Bottom Layer w0.2: R25.1@9.3,5.6 9.4,5.6 9.483,5.517 9.883,5.517 11.25,4.15 11.25,3.62 15,-0.13 v2(15,-1.4)
NetD73_4: D73.4 D74.4 D75.4 D76.4 D77.4 D78.4 D79.4 D80.4 D81.4 D82.4 D83.4 D84.4 R26.1 | length 61.9
  Top Layer w0.2: v1(-12.95,-4.1) -12.95,-4.65 D74.4@-12.75,-4.85 ; v1(-10.25,-4.1) -10.25,-4.65 D75.4@-10.05,-4.85 ; v1(-7.55,-4.1) -7.55,-4.65 D76.4@-7.35,-4.85 ; v1(-4.85,-4.1) -4.85,-4.65 D77.4@-4.65,-4.85 ; v1(-2.15,-4.1) -2.15,-4.65 D78.4@-1.95,-4.85 ; v1(0.55,-4.1) 0.55,-4.65 D79.4@0.75,-4.85 ; v1(3.25,-4.1) 3.25,-4.65 D80.4@3.45,-4.85 ; v1(5.95,-4.1) 5.95,-4.65 D81.4@6.15,-4.85 ; v2(8.65,-4.1) 8.65,-4.65 D82.4@8.85,-4.85 ; v1(11.35,-4.1) 11.35,-4.65 D83.4@11.55,-4.85 ; v2(14.05,-4.1) 14.05,-4.65 D84.4@14.25,-4.85 ; v2(16.75,-1.4) 16.75,-1.95 D73.4@16.95,-2.15
  Layer 1 w0.2: v1(-12.95,-4.1) -12.95,-4.949 -10.25,-4.949 ; v1(-10.25,-4.1) -10.25,-4.949 ; v1(-7.55,-4.1) -7.55,-4.949 ; v1(-4.85,-4.1) -4.85,-4.949 ; v1(-2.15,-4.1) -2.15,-4.949 ; v1(0.55,-4.1) 0.55,-4.949 ; v1(3.25,-4.1) 3.25,-4.949 ; v1(5.95,-4.1) 5.95,-4.949 ; v2(8.65,-4.1) 8.65,-4.949 ; v1(11.35,-4.1) 11.35,-4.949 ; v2(16.75,-1.4) 15.9,-2.25 v2(14.05,-4.1) 14.018,-4.132 14.018,-4.482 13.551,-4.949 11.35,-4.949 ; -10.25,-4.949 -7.55,-4.949 ; -7.55,-4.949 -4.85,-4.949 ; -4.85,-4.949 -2.15,-4.949 ; -2.15,-4.949 0.55,-4.949 ; 0.55,-4.949 3.25,-4.949 ; 3.25,-4.949 5.95,-4.949 ; 5.95,-4.949 8.65,-4.949 ; 8.65,-4.949 11.35,-4.949
  Bottom Layer w0.2: R26.1@8.2,4.6 8.4,4.4 9.995,4.4 10.55,3.845 10.55,3.33 13.4,0.48 13.4,-2 14.05,-2.65 v2(14.05,-4.1)
NetD85_K: D85.K D121.2 D122.2 D124.2 D125.2 D126.2 D127.2 D128.2 D129.2 D130.2 D132.2 R36.1 | length 97.2
  Top Layer w0.2: D124.2@-8.85,12.95 -8.647,12.747 v2(-8.647,12.351) ; D125.2@-6.15,12.95 -5.947,12.747 v1(-5.947,12.351) ; v2(-4.5,-16) -4.05,-16.45 -3.75,-16.45 D126.2@-3.45,-16.75 -3.247,-16.953 v2(-3.247,-17.349) ; D122.2@-3.45,12.95 -3.247,12.747 v2(-3.247,12.351) ; D127.2@-0.75,-16.75 -0.547,-16.953 v2(-0.547,-17.349) ; D121.2@-0.75,12.95 -0.547,12.747 v1(-0.547,12.351) ; D128.2@1.95,-16.75 2.153,-16.953 v4(2.153,-17.349) ; D132.2@1.95,12.95 2.153,12.747 v1(2.153,12.351) ; D129.2@4.65,12.95 4.853,12.747 v2(4.853,12.351) ; D130.2@7.35,12.95 7.553,12.747 v2(7.553,12.351)
  Layer 1 w0.2: v2(-8.647,12.351) -8.647,13.2 ; v1(-5.947,12.351) -5.947,13.2 ; v2(-4.5,-16) -5.2,-15.3 -6.3,-15.3 -8.2,-13.4 -10.8,-13.4 -14.85,-9.35 -14.85,-7.655 -15.4,-7.105 -15.4,-6.105 -17.3,-4.205 -17.3,-2.4 -17.925,-1.775 -17.925,1.675 -17.35,2.25 -17.35,5.27 -17.346,5.274 cw(c0,0) -16.271,7.998 -16.268,8 -15.15,8 -14.65,8.5 -14.65,9.85 -12.1,12.4 -12.1,12.61 -11.51,13.2 -8.647,13.2 ; v2@-3.247,-17.341 -3.247,-16.5 -0.547,-16.5 ; v2(-3.247,12.351) -3.247,13.2 ; v2(-0.547,-17.349) -0.547,-16.5 ; v1(-0.547,12.351) -0.547,13.2 ; v4(2.153,-17.349) 2.153,-16.5 -0.547,-16.5 ; v1(2.153,12.351) 2.153,13.2 ; v2(4.853,12.351) 4.853,13.2 ; v2(7.553,12.351) 7.553,13.2 4.853,13.2 ; -8.647,13.2 -5.947,13.2 ; -5.947,13.2 -3.247,13.2 ; -3.247,13.2 -0.547,13.2 ; -0.547,13.2 2.153,13.2 ; 2.153,13.2 4.853,13.2
  Bottom Layer w0.2: v4(2.153,-17.349) 3.9,-15.602 3.9,-8.3 4.797,-7.403 4.797,-5.603 6,-4.4 R36.1@6,-4.3 ; D85.K@6.7,11.3 D85.K@6.8,11.3 ; D85.K@6.7,11.4 6.8,11.4 7.486,12.086 7.486,12.284 v2(7.553,12.351)
NetD86_2: D86.2 D87.2 D88.2 D89.2 D90.2 D91.2 D92.2 D93.2 D94.2 D95.2 D96.2 R27.1 | length 61.6
  Top Layer w0.2: D86.2@-14.25,-8.65 -14.047,-8.853 v1(-14.047,-9.249) ; D87.2@-11.55,-8.65 -11.347,-8.853 v1(-11.347,-9.249) ; D88.2@-8.85,-8.65 -8.647,-8.853 v1(-8.647,-9.249) ; D89.2@-6.15,-8.65 -5.947,-8.853 v1(-5.947,-9.249) ; D90.2@-3.45,-8.65 -3.247,-8.853 v1(-3.247,-9.249) ; D91.2@-0.75,-8.65 -0.547,-8.853 v1(-0.547,-9.249) ; D92.2@1.95,-8.65 2.153,-8.853 v2(2.153,-9.249) ; D93.2@4.65,-8.65 4.853,-8.853 v2(4.853,-9.249) ; D94.2@7.35,-8.65 7.553,-8.853 v2(7.553,-9.249) ; D95.2@10.05,-8.65 10.253,-8.853 v2(10.253,-9.249) ; D96.2@12.75,-8.65 12.953,-8.853 v2(12.953,-9.209)
  Layer 1 w0.2: v1@-14.047,-9.241 -14.047,-8.4 -11.347,-8.4 ; v1@-11.347,-9.241 -11.347,-8.4 ; v1(-8.647,-9.249) -8.647,-8.4 ; v1(-5.947,-9.249) -5.947,-8.4 ; v1(-3.247,-9.249) -3.247,-8.4 ; v1(-0.547,-9.249) -0.547,-8.4 ; v2(2.153,-9.249) 2.153,-8.4 ; v2(4.853,-9.249) 4.853,-8.4 ; v2(7.553,-9.249) 7.553,-8.4 ; v2(10.253,-9.249) 10.253,-8.4 ; v2(12.953,-9.209) 12.953,-8.4 10.253,-8.4 ; -11.347,-8.4 -8.647,-8.4 ; -8.647,-8.4 -5.947,-8.4 ; -5.947,-8.4 -3.247,-8.4 ; -3.247,-8.4 -0.547,-8.4 ; -0.547,-8.4 2.153,-8.4 ; 2.153,-8.4 4.853,-8.4 ; 4.853,-8.4 7.553,-8.4 ; 7.553,-8.4 10.253,-8.4
  Bottom Layer w0.2: R27.1@7.1,3.6 7.3,3.8 7.4,3.8 7.6,4 9.9,4 10.2,3.7 10.2,3.185 13,0.385 13,-2.2 13.5,-2.7 13.5,-8.663 v2(12.953,-9.209)
NetD86_3: D86.3 D87.3 D88.3 D89.3 D90.3 D91.3 D92.3 D93.3 D94.3 D95.3 D96.3 R28.1 | length 61.2
  Top Layer w0.2: v1(-14.7,-6.8) -14.65,-6.85 -14.65,-7.25 -14.35,-7.55 D86.3@-14.25,-7.55 ; v1(-12,-6.8) -11.95,-6.85 -11.95,-7.25 -11.65,-7.55 D87.3@-11.55,-7.55 ; v1(-9.3,-6.8) -9.25,-6.85 -9.25,-7.25 -8.95,-7.55 D88.3@-8.85,-7.55 ; v1(-6.6,-6.8) -6.55,-6.85 -6.55,-7.25 -6.25,-7.55 D89.3@-6.15,-7.55 ; v2(-3.9,-6.8) -3.85,-6.85 -3.85,-7.25 -3.55,-7.55 D90.3@-3.45,-7.55 ; v1(-1.2,-6.8) -1.15,-6.85 -1.15,-7.25 -0.85,-7.55 D91.3@-0.75,-7.55 ; v1(1.5,-6.8) 1.55,-6.85 1.55,-7.25 1.85,-7.55 D92.3@1.95,-7.55 ; v1(4.2,-6.8) 4.25,-6.85 4.25,-7.25 4.55,-7.55 D93.3@4.65,-7.55 ; v1(6.9,-6.8) 6.95,-6.85 6.95,-7.25 7.25,-7.55 D94.3@7.35,-7.55 ; v1(9.6,-6.8) 9.65,-6.85 9.65,-7.25 9.95,-7.55 D95.3@10.05,-7.55 ; v2(12.3,-6.8) 12.35,-6.85 12.35,-7.25 12.65,-7.55 D96.3@12.75,-7.55
  Layer 1 w0.2: v1(-14.7,-6.8) -14.25,-7.25 -13.8,-7.25 -13.5,-6.95 -13.5,-6.5 -13.15,-6.15 -12.65,-6.15 v1(-12,-6.8) -11.55,-7.25 -11.1,-7.25 -10.8,-6.95 -10.8,-6.5 -10.45,-6.15 -9.95,-6.15 -8.85,-7.25 -8.4,-7.25 -8.1,-6.95 -8.1,-6.5 -7.75,-6.15 -7.25,-6.15 -6.15,-7.25 -5.7,-7.25 -5.4,-6.95 -5.4,-6.5 -5.05,-6.15 -4.55,-6.15 -3.45,-7.25 -3,-7.25 -2.7,-6.95 -2.7,-6.5 -2.35,-6.15 -1.85,-6.15 -0.75,-7.25 -0.3,-7.25 0,-6.95 0,-6.5 0.35,-6.15 0.85,-6.15 1.95,-7.25 2.4,-7.25 2.7,-6.95 2.7,-6.5 3.05,-6.15 3.55,-6.15 4.65,-7.25 5.1,-7.25 5.4,-6.95 5.4,-6.5 5.75,-6.15 6.25,-6.15 v1(6.9,-6.8) 7.35,-7.25 7.8,-7.25 8.1,-6.95 8.1,-6.5 8.45,-6.15 8.95,-6.15 10.05,-7.25 10.5,-7.25 10.8,-6.95 10.8,-6.5 11.15,-6.15 11.65,-6.15 v2(12.3,-6.8)
  Bottom Layer w0.2: R28.1@9.3,3.4 9.4,3.4 9.6,3.2 9.6,3.19 11.7,1.09 11.7,-6.2 v2(12.3,-6.8)
NetD86_4: D86.4 D87.4 D88.4 D89.4 D90.4 D91.4 D92.4 D93.4 D94.4 D95.4 D96.4 R29.1 | length 57
  Top Layer w0.2: v1(-12.95,-6.8) -12.95,-7.35 D86.4@-12.75,-7.55 ; v1(-10.25,-6.8) -10.25,-7.35 D87.4@-10.05,-7.55 ; v1(-7.55,-6.8) -7.55,-7.35 D88.4@-7.35,-7.55 ; v2(-4.85,-6.8) -4.85,-7.35 D89.4@-4.65,-7.55 ; v1(-2.15,-6.8) -2.15,-7.35 D90.4@-1.95,-7.55 ; v1(0.55,-6.8) 0.55,-7.35 D91.4@0.75,-7.55 ; v1(3.25,-6.8) 3.25,-7.35 D92.4@3.45,-7.55 ; v2(5.95,-6.8) 5.95,-7.35 D93.4@6.15,-7.55 ; v2(8.65,-6.8) 8.65,-7.35 D94.4@8.85,-7.55 ; v2(11.35,-6.8) 11.35,-7.35 D95.4@11.55,-7.55 ; v2(14.05,-6.8) 14.05,-7.35 D96.4@14.25,-7.55
  Layer 1 w0.2: v1(-12.95,-6.8) -12.95,-7.649 -10.25,-7.649 ; v1(-10.25,-6.8) -10.25,-7.649 ; v1(-7.55,-6.8) -7.55,-7.649 ; v2(-4.85,-6.8) -4.85,-7.649 ; v1(-2.15,-6.8) -2.15,-7.649 ; v1(0.55,-6.8) 0.55,-7.649 ; v1(3.25,-6.8) 3.25,-7.649 ; v2(5.95,-6.8) 5.95,-7.649 ; v2(8.65,-6.8) 8.65,-7.649 ; v2(11.35,-6.8) 11.35,-7.649 ; v2(14.05,-6.8) 14.05,-7.649 11.35,-7.649 ; -10.25,-7.649 -7.55,-7.649 ; -7.55,-7.649 -4.85,-7.649 ; -4.85,-7.649 -2.15,-7.649 ; -2.15,-7.649 0.55,-7.649 ; 0.55,-7.649 3.25,-7.649 ; 3.25,-7.649 5.95,-7.649 ; 5.95,-7.649 8.65,-7.649 ; 8.65,-7.649 11.35,-7.649
  Bottom Layer w0.2: R29.1@8.2,2.4 9.895,2.4 11.35,0.945 v2(11.35,-6.8)
NetD97_K: D97.K D121.3 D122.3 D124.3 D125.3 D126.3 D127.3 D128.3 D129.3 D130.3 D132.3 R37.1 | length 98.9
  Top Layer w0.2: v2(-15.7,8.94) -15.75,8.889 -16.23,8.889 ccw(c0,0) -17.643,5.581 -17.642,5.58 -17.642,4.058 -17.8,3.9 -17.8,2 -18,1.8 -18,-1.8 -17.8,-2 -17.8,-3.8 -15.4,-6.2 -15.4,-9.1 -9.1,-15.4 -3.85,-15.4 -3.6,-15.65 D126.3@-3.45,-15.65 ; v2(-9.206,14.706) -9.206,14.35 -8.906,14.05 D124.3@-8.85,14.05 ; v2(-6.6,14.8) -6.55,14.75 -6.55,14.35 -6.25,14.05 D125.3@-6.15,14.05 ; v2(-3.9,-14.9) -3.85,-14.95 D126.3@-3.85,-15.35 ; v2(-3.9,14.8) -3.85,14.75 -3.85,14.35 -3.55,14.05 D122.3@-3.45,14.05 ; v2(-1.2,-14.9) -1.15,-14.95 -1.15,-15.35 -0.85,-15.65 D127.3@-0.75,-15.65 ; v2(-1.2,14.8) -1.15,14.75 -1.15,14.35 -0.85,14.05 D121.3@-0.75,14.05 ; v2(1.5,-14.9) 1.55,-14.95 1.55,-15.35 1.85,-15.65 D128.3@1.95,-15.65 ; v2(1.5,14.8) 1.55,14.75 1.55,14.35 1.85,14.05 D132.3@1.95,14.05 ; v2(4.2,14.8) 4.25,14.75 4.25,14.35 4.55,14.05 D129.3@4.65,14.05 ; v2(6.9,14.8) 6.95,14.75 6.95,14.35 7.25,14.05 D130.3@7.35,14.05
  Layer 1 w0.2: v2(-15.7,8.94) -15.4,9.24 -15.4,10.104 -12.9,12.604 -12.9,12.8 -10.994,14.706 v2(-9.206,14.706) -9.112,14.706 -8.755,14.35 -8.4,14.35 -8.1,14.65 -8.1,15.1 -7.75,15.45 -7.25,15.45 -6.15,14.35 -5.7,14.35 -5.4,14.65 -5.4,15.1 -5.05,15.45 -4.55,15.45 v2(-3.9,14.8) -3.45,14.35 -3,14.35 -2.7,14.65 -2.7,15.1 -2.35,15.45 -1.85,15.45 -0.75,14.35 -0.3,14.35 0,14.65 0,15.1 0.35,15.45 0.85,15.45 1.95,14.35 2.4,14.35 2.7,14.65 2.7,15.1 3.05,15.45 3.55,15.45 4.65,14.35 5.1,14.35 5.4,14.65 5.4,15.1 5.65,15.35 6.35,15.35 v2@6.925,14.775 ; v2(-3.9,-14.9) -3.45,-15.35 -3,-15.35 -2.7,-15.05 -2.7,-14.6 -2.35,-14.25 -1.85,-14.25 -0.75,-15.35 -0.3,-15.35 0,-15.05 0,-14.6 0.35,-14.25 0.85,-14.25 v2(1.5,-14.9)
  Bottom Layer w0.2: v2(1.5,-14.9) 1.5,-13.9 2.7,-12.7 2.7,-8.6 4.3,-7 4.3,-4.9 4.8,-4.4 R37.1@4.8,-4.3 ; D97.K@6.7,12.7 6.8,12.7 7.35,13.25 7.35,14.404 6.954,14.8 v2(6.9,14.8)
NetD98_K: D98.K D121.4 D122.4 D124.4 D125.4 D126.4 D127.4 D128.4 D129.4 D130.4 D132.4 R38.1 | length 100.5
  Top Layer w0.2: v2(-7.55,14.8) -7.55,14.25 D124.4@-7.35,14.05 ; v2(-4.85,14.8) -4.85,14.25 D125.4@-4.65,14.05 ; v2(-2.15,-14.9) -2.15,-15.45 D126.4@-1.95,-15.65 ; v2(-2.15,14.8) -2.15,14.25 D122.4@-1.95,14.05 ; v2(0.55,-14.9) 0.55,-15.45 D127.4@0.75,-15.65 ; v2(0.55,14.8) 0.55,14.25 D121.4@0.75,14.05 ; v2(3.25,-14.9) 3.25,-15.45 D128.4@3.45,-15.65 ; v2(3.25,14.8) 3.25,14.25 D132.4@3.45,14.05 ; v2(5.95,14.8) 5.95,14.25 D129.4@6.15,14.05 ; D130.4@8.85,14.05 9.15,13.75 9.8,13.75 v2(9.85,13.7)
  Layer 1 w0.2: v2(-7.55,14.8) -7.55,13.951 ; v2(-4.85,14.8) -4.85,13.951 ; v2(-2.15,-14.9) -2.15,-15.749 ; v2(-2.15,14.8) -2.15,13.951 ; v2(0.55,-14.9) 0.55,-15.749 ; v2(0.55,14.8) 0.55,13.951 ; v2(3.25,-14.9) 3.25,-15.749 0.55,-15.749 ; v2(3.25,14.8) 3.25,13.951 ; v2(5.95,14.8) 5.95,13.951 ; v2(9.85,13.7) 6.201,13.7 5.95,13.951 ; -7.55,13.951 -8.549,13.951 -8.9,13.6 -11.605,13.6 -12.55,12.655 -12.55,12.459 -15,10.009 -15,8.7 -15.35,8.35 -16.1,8.35 -16.512,8.35 -16.516,8.346 ccw(c0,0) -17.697,5.407 -17.7,5.404 -17.7,2.5 -18.35,1.85 -18.35,-1.85 -17.7,-2.5 -17.7,-4.3 -15.8,-6.2 -15.8,-7.2 -15.2,-7.8 -15.2,-9.6 -10.9,-13.9 -8.3,-13.9 -6.5,-15.7 -5.6,-15.7 -4.7,-16.6 -4.1,-16.6 -3.249,-15.749 -2.15,-15.749 ; -7.55,13.951 -4.85,13.951 ; -4.85,13.951 -2.15,13.951 ; -2.15,-15.749 0.55,-15.749 ; -2.15,13.951 0.55,13.951 ; 0.55,13.951 3.25,13.951 ; 3.25,13.951 5.95,13.951
  Bottom Layer w0.2: v2(0.55,-14.9) 0.55,-13.85 0.9,-13.5 0.9,-9.2 3.8,-6.3 3.8,-4.5 R38.1@3.6,-4.3 ; v2(5.95,14.8) 6.7,14.05 D98.K@6.7,14
NetD99_2: D99.2 D100.2 D101.2 D102.2 D103.2 D104.2 D105.2 D106.2 D107.2 R30.1 | length 52.8
  Top Layer w0.2: D99.2@-11.55,-11.35 -11.347,-11.553 v1(-11.347,-11.949) ; D100.2@-8.85,-11.35 -8.647,-11.553 v2(-8.647,-11.949) ; D101.2@-6.15,-11.35 -5.947,-11.553 v2(-5.947,-11.949) ; D102.2@-3.45,-11.35 -3.247,-11.553 v1(-3.247,-11.949) ; D103.2@-0.75,-11.35 -0.547,-11.553 v2(-0.547,-11.949) ; D104.2@1.95,-11.35 2.153,-11.553 v2(2.153,-11.949) ; D105.2@4.65,-11.35 4.853,-11.553 v2(4.853,-11.949) ; D106.2@7.35,-11.35 7.553,-11.553 v2(7.553,-11.949) ; D107.2@10.05,-11.35 10.253,-11.553 v2(10.253,-11.909)
  Layer 1 w0.2: v1@-11.347,-11.941 -11.347,-11.1 -8.647,-11.1 ; v2@-8.647,-11.941 -8.647,-11.1 ; v2(-5.947,-11.949) -5.947,-11.1 ; v1(-3.247,-11.949) -3.247,-11.1 ; v2(-0.547,-11.949) -0.547,-11.1 ; v2(2.153,-11.949) 2.153,-11.1 ; v2(4.853,-11.949) 4.853,-11.1 ; v2(7.553,-11.949) 7.553,-11.1 ; v2(10.253,-11.909) 10.253,-11.1 7.553,-11.1 ; -8.647,-11.1 -5.947,-11.1 ; -5.947,-11.1 -3.247,-11.1 ; -3.247,-11.1 -0.547,-11.1 ; -0.547,-11.1 2.153,-11.1 ; 2.153,-11.1 4.853,-11.1 ; 4.853,-11.1 7.553,-11.1
  Bottom Layer w0.2: R30.1@7.1,1.4 7.2,1.4 7.6,1.8 10,1.8 11,0.8 11,-4.6 10.8,-4.8 10.8,-11.363 v2(10.253,-11.909)
NetD99_3: D99.3 D100.3 D101.3 D102.3 D103.3 D104.3 D105.3 D106.3 D107.3 R31.1 | length 51.7
  Top Layer w0.2: v1(-12,-9.5) -11.95,-9.55 -11.95,-9.95 -11.65,-10.25 D99.3@-11.55,-10.25 ; v1(-9.3,-9.5) -9.25,-9.55 -9.25,-9.95 -8.95,-10.25 D100.3@-8.85,-10.25 ; v1(-6.6,-9.5) -6.55,-9.55 -6.55,-9.95 -6.25,-10.25 D101.3@-6.15,-10.25 ; v1(-3.9,-9.5) -3.85,-9.55 -3.85,-9.95 -3.55,-10.25 D102.3@-3.45,-10.25 ; v1(-1.2,-9.5) -1.15,-9.55 -1.15,-9.95 -0.85,-10.25 D103.3@-0.75,-10.25 ; v2(1.5,-9.5) 1.55,-9.55 1.55,-9.95 1.85,-10.25 D104.3@1.95,-10.25 ; v1(4.2,-9.5) 4.25,-9.55 4.25,-9.95 4.55,-10.25 D105.3@4.65,-10.25 ; v1(6.9,-9.5) 6.95,-9.55 6.95,-9.95 7.25,-10.25 D106.3@7.35,-10.25 ; v2(9.6,-9.5) 9.65,-9.55 9.65,-9.95 9.95,-10.25 D107.3@10.05,-10.25
  Layer 1 w0.2: v1(-12,-9.5) -11.55,-9.95 -11.1,-9.95 -10.8,-9.65 -10.8,-9.2 -10.45,-8.85 -9.95,-8.85 -8.85,-9.95 -8.4,-9.95 -8.1,-9.65 -8.1,-9.2 -7.75,-8.85 -7.25,-8.85 -6.15,-9.95 -5.7,-9.95 -5.4,-9.65 -5.4,-9.2 -5.05,-8.85 -4.55,-8.85 -3.45,-9.95 -3,-9.95 -2.7,-9.65 -2.7,-9.2 -2.35,-8.85 -1.85,-8.85 -0.75,-9.95 -0.3,-9.95 0,-9.65 0,-9.2 0.35,-8.85 0.85,-8.85 1.95,-9.95 2.4,-9.95 2.7,-9.65 2.7,-9.2 3.05,-8.85 3.55,-8.85 4.65,-9.95 5.1,-9.95 5.4,-9.65 5.4,-9.2 5.75,-8.85 6.25,-8.85 7.35,-9.95 7.8,-9.95 8.1,-9.65 8.1,-9.2 8.45,-8.85 8.95,-8.85 v2(9.6,-9.5)
  Bottom Layer w0.2: R31.1@9.3,1.2 9.4,1.2 10.65,-0.05 10.65,-4.45 9.6,-5.5 v2(9.6,-9.5)
NetD99_4: D99.4 D100.4 D101.4 D102.4 D103.4 D104.4 D105.4 D106.4 D107.4 R32.1 | length 48.9
  Top Layer w0.2: v1(-10.25,-9.5) -10.25,-10.05 D99.4@-10.05,-10.25 ; v1(-7.55,-9.5) -7.55,-10.05 D100.4@-7.35,-10.25 ; v1(-4.85,-9.5) -4.85,-10.05 D101.4@-4.65,-10.25 ; v2(-2.15,-9.5) -2.15,-10.05 D102.4@-1.95,-10.25 ; v1(0.55,-9.5) 0.55,-10.05 D103.4@0.75,-10.25 ; v2(3.25,-9.5) 3.25,-10.05 D104.4@3.45,-10.25 ; v2(5.95,-9.5) 5.95,-10.05 D105.4@6.15,-10.25 ; v2(8.65,-9.5) 8.65,-10.05 D106.4@8.85,-10.25 ; v2(11.35,-9.5) 11.35,-10.05 D107.4@11.55,-10.25
  Layer 1 w0.2: v1(-10.25,-9.5) -10.25,-10.349 -7.55,-10.349 ; v1(-7.55,-9.5) -7.55,-10.349 ; v1(-4.85,-9.5) -4.85,-10.349 ; v2(-2.15,-9.5) -2.15,-10.349 ; v1(0.55,-9.5) 0.55,-10.349 ; v2(3.25,-9.5) 3.25,-10.349 ; v2(5.95,-9.5) 5.95,-10.349 ; v2(8.65,-9.5) 8.65,-10.349 ; v2(11.35,-9.5) 11.35,-10.349 8.65,-10.349 ; -7.55,-10.349 -4.85,-10.349 ; -4.85,-10.349 -2.15,-10.349 ; -2.15,-10.349 0.55,-10.349 ; 0.55,-10.349 3.25,-10.349 ; 3.25,-10.349 5.95,-10.349 ; 5.95,-10.349 8.65,-10.349
  Bottom Layer w0.2: R32.1@8.2,0.2 9.679,0.2 10.3,-0.421 10.3,-4.305 9.2,-5.405 9.2,-8.95 v2(8.65,-9.5)
NetD112_2: D112.2 D113.2 D114.2 D115.2 D116.2 D117.2 D118.2 R33.1 | length 44.4
  Top Layer w0.2: D112.2@-8.85,-14.05 -8.647,-14.253 -8.647,-14.649 -8.395,-14.9 -6.239,-14.9 -5.988,-14.649 v2(-5.947,-14.649) -5.947,-14.253 D113.2@-6.15,-14.05 ; D114.2@-3.45,-14.05 -3.247,-14.253 v2(-3.247,-14.649) ; D115.2@-0.75,-14.05 -0.547,-14.253 v2(-0.547,-14.649) ; D116.2@1.95,-14.05 2.153,-14.253 v2(2.153,-14.649) ; D117.2@4.65,-14.05 4.853,-14.253 v2(4.853,-14.649) ; D118.2@7.35,-14.05 7.553,-14.253 v2(7.553,-14.649)
  Layer 1 w0.2: v2@-5.947,-14.641 -5.947,-13.8 -3.247,-13.8 ; v2@-3.247,-14.641 -3.247,-13.8 ; v2(-0.547,-14.649) -0.547,-13.8 ; v2(2.153,-14.649) 2.153,-13.8 ; v2(4.853,-14.649) 4.853,-13.8 ; v2(7.553,-14.649) 7.553,-13.8 4.853,-13.8 ; -3.247,-13.8 -0.547,-13.8 ; -0.547,-13.8 2.153,-13.8 ; 2.153,-13.8 4.853,-13.8
  Bottom Layer w0.2: R33.1@7.1,-0.8 7.2,-0.8 7.6,-0.4 9.754,-0.4 9.95,-0.596 9.95,-4.16 8.1,-6.01 8.1,-14.102 v2(7.553,-14.649)
NetD112_3: D112.3 D113.3 D114.3 D115.3 D116.3 D117.3 D118.3 R34.1 | length 42.7
  Top Layer w0.2: v2(-9.3,-12.2) -9.25,-12.25 -9.25,-12.65 -8.95,-12.95 D112.3@-8.85,-12.95 ; v2(-6.6,-12.2) -6.55,-12.25 -6.55,-12.65 -6.25,-12.95 D113.3@-6.15,-12.95 ; v2(-3.9,-12.2) -3.85,-12.25 -3.85,-12.65 -3.55,-12.95 D114.3@-3.45,-12.95 ; v2(-1.2,-12.2) -1.15,-12.25 -1.15,-12.65 -0.85,-12.95 D115.3@-0.75,-12.95 ; v2(1.5,-12.2) 1.55,-12.25 1.55,-12.65 1.85,-12.95 D116.3@1.95,-12.95 ; v1(4.2,-12.2) 4.25,-12.25 4.25,-12.65 4.55,-12.95 D117.3@4.65,-12.95 ; v2(6.9,-12.2) 6.95,-12.25 6.95,-12.65 7.25,-12.95 D118.3@7.35,-12.95
  Layer 1 w0.2: v2(-9.3,-12.2) -8.85,-12.65 -8.4,-12.65 -8.1,-12.35 -8.1,-11.9 -7.75,-11.55 -7.25,-11.55 v2(-6.6,-12.2) -6.15,-12.65 -5.7,-12.65 -5.4,-12.35 -5.4,-11.9 -5.05,-11.55 -4.55,-11.55 -3.45,-12.65 -3,-12.65 -2.7,-12.35 -2.7,-11.9 -2.35,-11.55 -1.85,-11.55 -0.75,-12.65 -0.3,-12.65 0,-12.35 0,-11.9 0.35,-11.55 0.85,-11.55 1.95,-12.65 2.4,-12.65 2.7,-12.35 2.7,-11.9 3.05,-11.55 3.55,-11.55 4.65,-12.65 5.1,-12.65 5.4,-12.35 5.4,-11.9 5.75,-11.55 6.25,-11.55 v2(6.9,-12.2)
  Bottom Layer w0.2: v2(6.9,-12.2) 6.947,-12.153 6.947,-6.153 7.3,-5.8 7.8,-5.8 9.3,-4.3 R34.1@9.3,-1
NetD112_4: D112.4 D113.4 D114.4 D115.4 D116.4 D117.4 D118.4 R35.1 | length 39.1
  Top Layer w0.2: v2(-7.55,-12.2) -7.55,-12.75 D112.4@-7.35,-12.95 ; v2(-4.85,-12.2) -4.85,-12.75 D113.4@-4.65,-12.95 ; v2(-2.15,-12.2) -2.15,-12.75 D114.4@-1.95,-12.95 ; v1(0.55,-12.2) 0.55,-12.75 D115.4@0.75,-12.95 ; v2(3.25,-12.2) 3.25,-12.75 D116.4@3.45,-12.95 ; v2(5.95,-12.2) 5.95,-12.75 D117.4@6.15,-12.95 ; v2(8.65,-12.2) 8.65,-12.75 D118.4@8.85,-12.95
  Layer 1 w0.2: v2(-7.55,-12.2) -7.55,-13.049 -4.85,-13.049 ; v2(-4.85,-12.2) -4.85,-13.049 ; v2(-2.15,-12.2) -2.15,-13.049 ; v1(0.55,-12.2) 0.55,-13.049 ; v2(3.25,-12.2) 3.25,-13.049 ; v2(5.95,-12.2) 5.95,-13.049 ; v2(8.65,-12.2) 8.65,-13.049 5.95,-13.049 ; -4.85,-13.049 -2.15,-13.049 ; -2.15,-13.049 0.55,-13.049 ; 0.55,-13.049 3.25,-13.049 ; 3.25,-13.049 5.95,-13.049
  Bottom Layer w0.2: v2(5.95,-12.2) 6.597,-11.553 6.597,-5.903 8.1,-4.4 8.1,-2.1 R35.1@8.2,-2
NetIC1_10: IC1.10 R4.2 | length 3.2
  Bottom Layer w0.2: IC1.10@-0.8,-0.375 -0.8,-2.5 -0.4,-2.9 -0.4,-3.1 R4.2@-0.2,-3.3
NetIC1_12: IC1.12 J3.2 | length 5.4
  Bottom Layer w0.2: J3.2@-2.5,-5.4 -2.5,-4.8 -2.15,-4.45 -2.15,-2.95 -2,-2.8 -2,-1.696 -1.6,-1.296 IC1.12@-1.6,-0.375
NetIC1_14: IC1.14 R5.2 | length 2.1
  Bottom Layer w0.2: R5.2@-3.8,-1.5 -3.7,-1.5 -3.3,-1.1 -2.655,-1.1 -2.4,-0.845 IC1.14@-2.4,-0.375
R1: D1.1 D13.1 D25.1 D37.1 D49.1 D61.1 D73.1 D121.1 IC1.32 | length 92.1
  Top Layer w0.2: -16.2,-0.55 D49.1@-15.45,-0.55 ; -16.2,2.15 D37.1@-15.45,2.15 ; D61.1@-15.45,-3.25 -16.2,-3.25 -16.2,4.242 -16.583,4.625 -16.875,4.625 -17.25,5 -17.25,5.595 -17.243,5.602 cw(c0,0) -16.221,8.098 -16.219,8.1 -15.425,8.1 -15.1,8.425 -15.1,9.6 -13.9,10.8 -13.9,11.6 -12.4,13.1 -11.8,13.1 v2(-10.7,14.2) -10.23,14.67 -10.23,14.92 -8.95,16.2 -7.295,16.2 -6.495,17 -5.2,17 -4.25,17.95 0,17.95 ; D121.1@0.75,12.95 0,12.95 0,15.65 ; D1.1@0.75,15.65 0,15.65 ; 16.2,-0.55 D13.1@16.95,-0.55 ; D73.1@16.95,-3.25 16.2,-3.25 16.2,2.15 D25.1@16.95,2.15 17.25,2.45 17.55,2.45 17.8,2.7 17.8,3.9 17.4,4.3 16.4,4.3 15.2,5.5 15.2,9.5 14.4,10.3 14.4,11.023 9.923,15.5 9.2,15.5 8.777,15.923 5.677,15.923 3.65,17.95 0,17.95 ; 0,15.65 0,17.95
  Bottom Layer w0.2: v2(-10.7,14.2) -10.642,14.2 -10.042,13.6 -8.9,13.6 -8,12.7 -7.3,12.7 -4.95,10.35 -3.35,10.35 -2.4,9.4 IC1.32@-2.4,6.375